# Altium PCB Octo-Electrode.PcbDoc (part 6 of 6)
Units mm, origin at the board's own origin, x right, y up, seen from the top; angles counter-clockwise.
Board outline 202.91 x 135.89 mm, 2 copper layers (Top Layer, Bottom Layer); 289 components, 165 nets, 790 pads, 510 vias.
Unrouted connection lines stored in the file: 83.
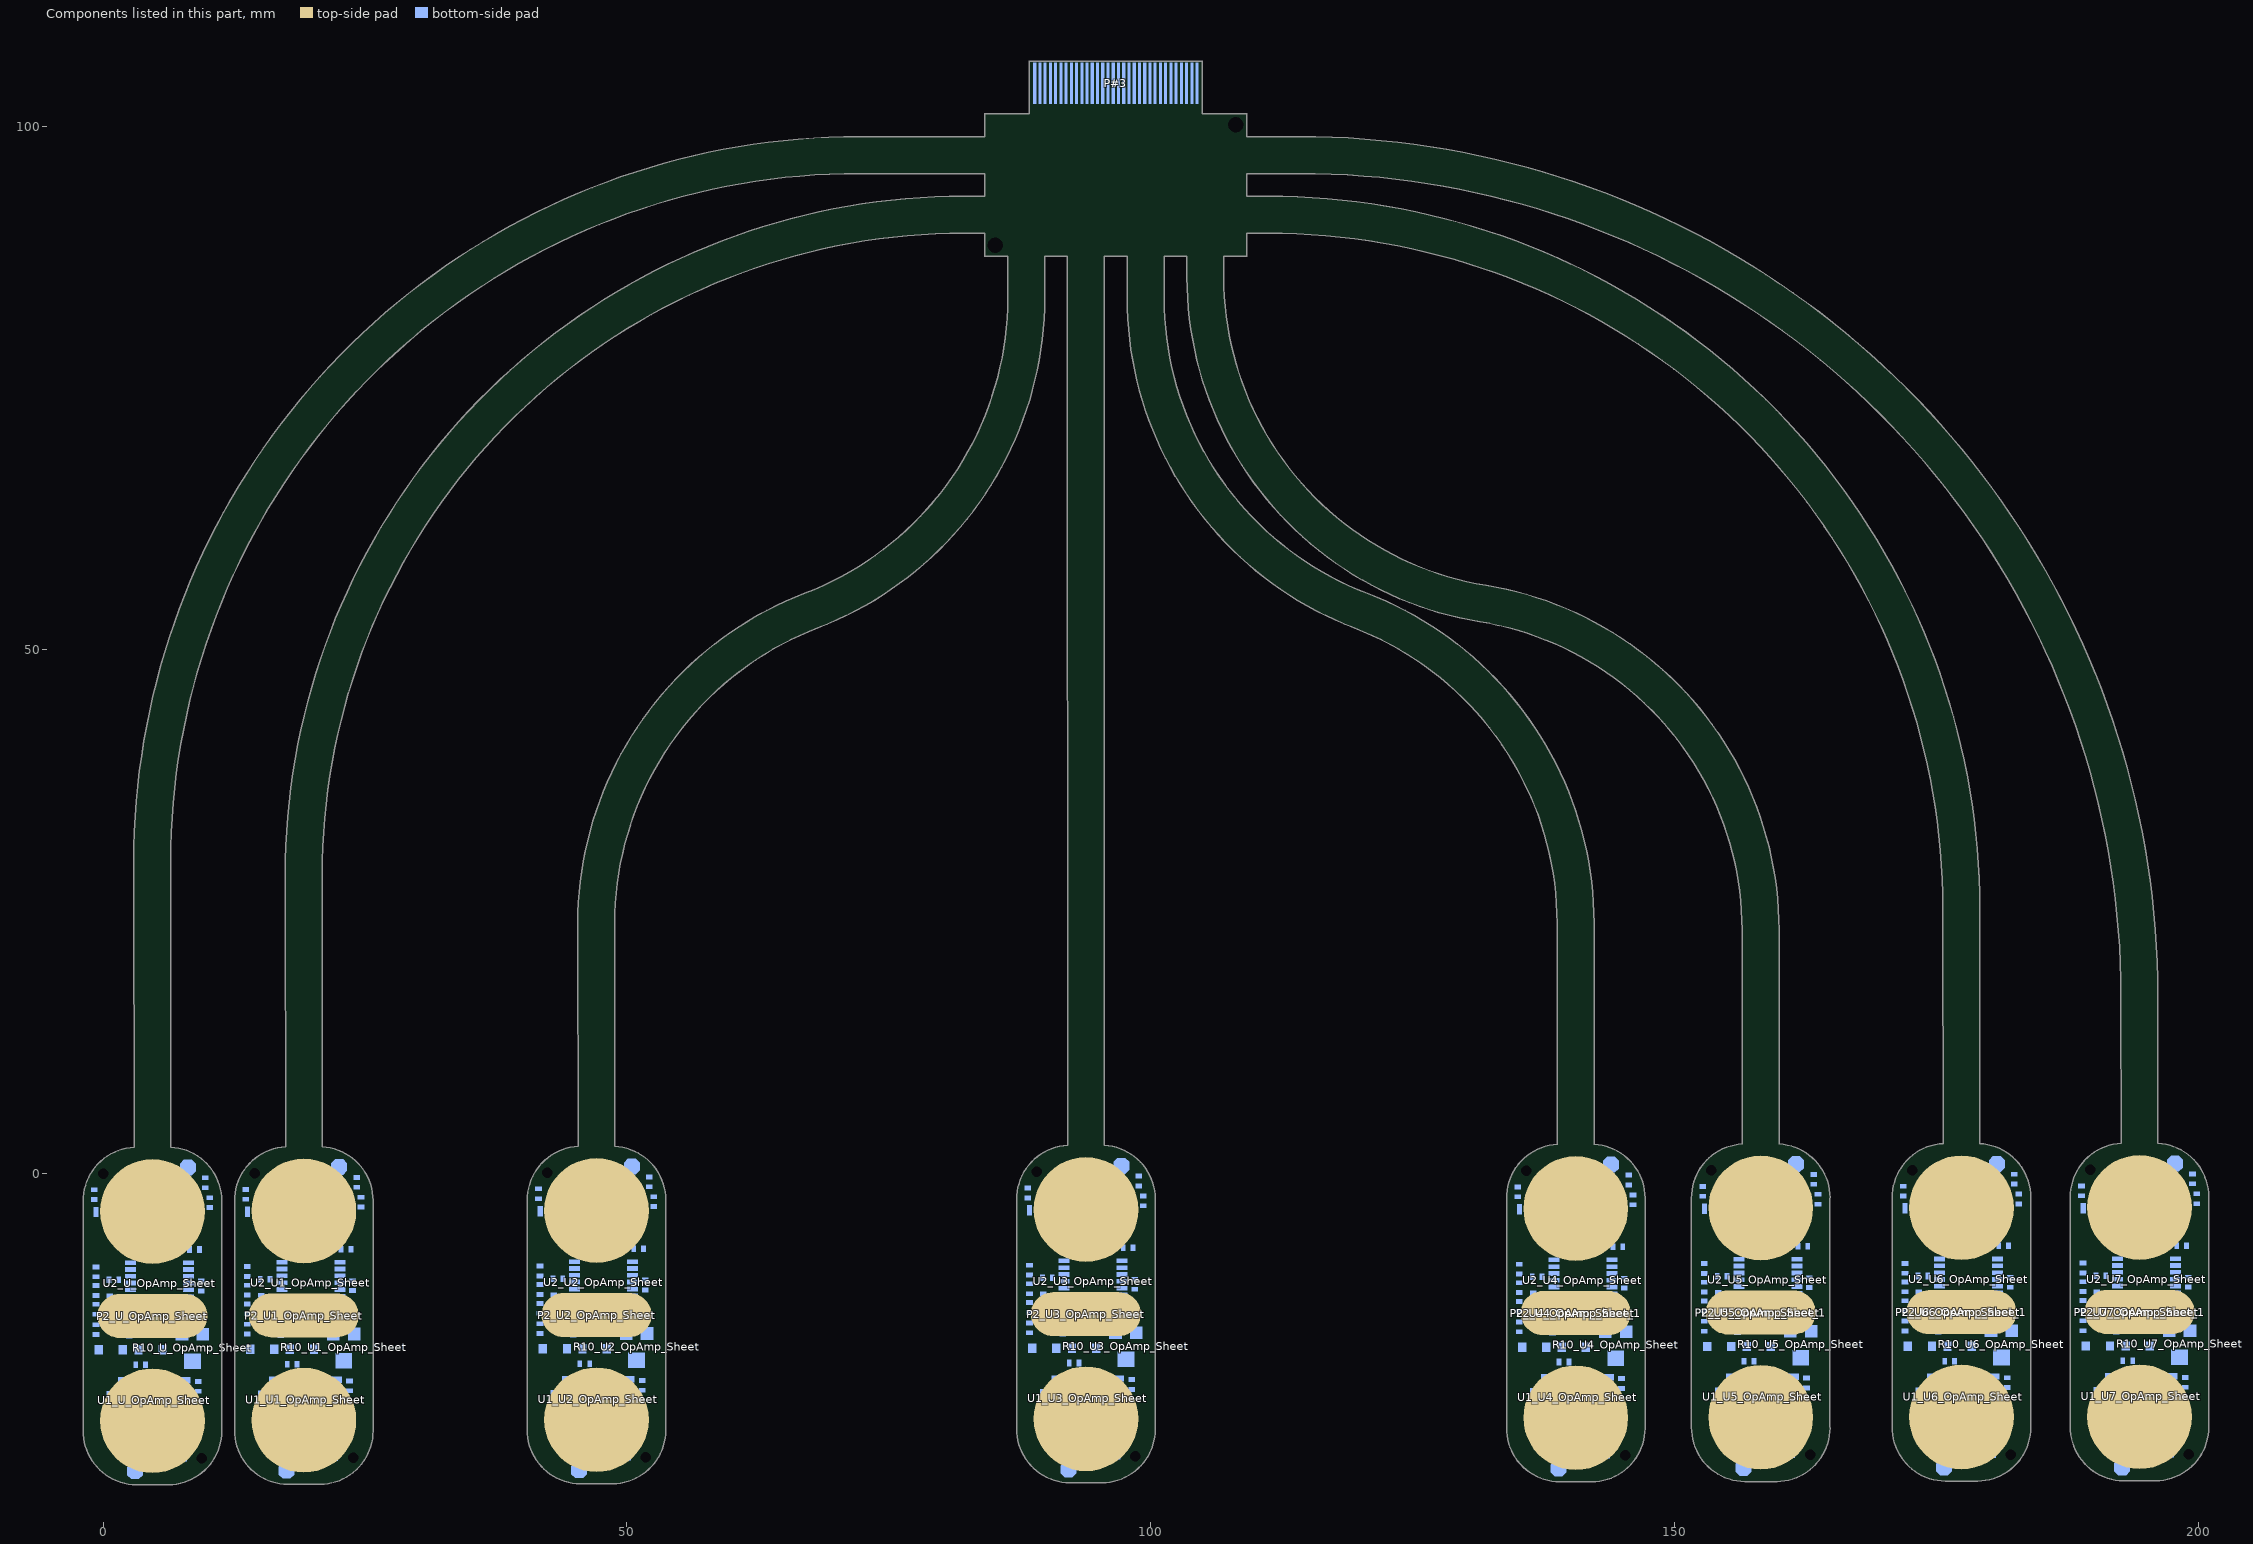
[diagram p5: the components of this part, seen from the top]

## Other copper (continued)
Bottom Layer:
  region net IN2P_U4_OpAmp_Sheet: 141.937,-16.141 139.905,-16.141 139.905,-18.326 141.937,-18.326
  region net Measure*_U4_OpAmp_Sheet: 145.188,-16.675 143.588,-16.675 143.588,-18.046 145.188,-18.046
  region net RECT_U4_OpAmp_Sheet: 135.587,-7.937 134.799,-7.937 134.799,-8.902 135.587,-8.902
  region net #rg_U4_OpAmp_Sheet: 138.888,-21.374 136.018,-21.374 136.018,-22.288 138.888,-22.288
  region net *rg_U4_OpAmp_Sheet: 138.888,-20.231 136.044,-20.231 136.044,-21.018 138.888,-21.018
  region net NetC3_U4_OpAmp_Sheet_2: 135.891,-12.916 134.697,-12.916 134.697,-14.414 135.891,-14.414
  region net IN2N_U4_OpAmp_Sheet: 135.688,-9.309 134.697,-9.309 134.697,-10.731 135.688,-10.731
  region net NetLED1_U4_OpAmp_Sheet_2: 135.484,-1.765 134.697,-1.765 134.697,-4 135.484,-4
  region net GND: 146.464,-1.638 144.477,-1.638 144.477,-2.289 146.464,-2.289
  region net NetC3_U4_OpAmp_Sheet_2: 135.891,-12.916 134.697,-12.916 134.697,-13.424 135.891,-13.424
  region net VCC_3V3: 141.886,-23.38 141.886,-24.854 143.181,-24.854 143.181,-23.38
  region net RECT_U4_OpAmp_Sheet: 139.016,-7.937 134.799,-7.937 134.799,-8.445 139.016,-8.445
  region net NetR4_U4_OpAmp_Sheet_1: 137.034,-11.925 136.272,-11.925 136.272,-15.633 137.034,-15.633
  region net NetC6_U4_OpAmp_Sheet_2: 140.844,-6.159 139.447,-6.159 139.447,-7.328 140.844,-7.328
  region net SMOOTH_U4_OpAmp_Sheet: 142.647,-6.642 141.25,-6.642 141.25,-7.353 142.647,-7.353
  region net NetR4_U4_OpAmp_Sheet_1: 137.034,-11.925 134.773,-11.925 134.773,-12.674 137.034,-12.674
  region net IN2P_U4_OpAmp_Sheet: 141.937,-17.64 139.701,-17.64 139.701,-18.326 141.937,-18.326
  region net OUT1_U4_OpAmp_Sheet: 139.625,-15.633 137.314,-15.633 137.314,-17.056 139.625,-17.056
  region net NetD1_U4_OpAmp_Sheet_2: 136.247,-15.964 135.028,-15.964 135.028,-17.259 136.247,-17.259
  region net VCC_3V3: 146.356,-22.923 141.886,-22.923 141.886,-23.787 146.356,-23.787
  region net Measure*_U4_OpAmp_Sheet: 144.07,-14.287 142.699,-14.287 142.699,-18.377 144.07,-18.377
  region net VREF_GND: 146.102,-20.129 142.622,-20.129 142.622,-21.171 146.102,-21.171
  region net -VCC_3V3: 146.966,-2.705 145.625,-2.705 145.625,-4.737 146.966,-4.737
  region net VREF_GND: 143.384,-1.911 135.714,-1.911 135.714,-2.603 143.384,-2.603
  region net VREF_GND: 142.927,-25.12 141.378,-25.12 141.378,-26.098 142.927,-26.098
  region net Measure*_U4_OpAmp_Sheet: 144.832,-11.9 143.029,-11.9 143.029,-13.449 144.832,-13.449
  region net -VCC_3V3: 145.518,-9.69 144.807,-9.69 144.807,-10.35 145.518,-10.35
  region net -VCC_3V3: 145.62,-19.088 142.14,-19.088 142.14,-19.926 145.62,-19.926
  region net NetD1_U4_OpAmp_Sheet_2: 136.907,-11.061 134.799,-11.061 134.799,-11.671 136.907,-11.671
  region net NetC1_U4_OpAmp_Sheet_2: 144.4,-24.092 143.384,-24.092 143.384,-27.419 144.4,-27.419
  region net Measure_U4_OpAmp_Sheet: 137.288,-2.883 136.425,-2.883 136.425,-6.489 137.288,-6.489
  region net RECT_U4_OpAmp_Sheet: 139.038,-6.667 138.251,-6.667 138.251,-8.41 139.038,-8.41
  region net GND: 143.405,-1.211 144.483,-2.289 145.123,-1.649 144.045,-0.571
  region net VREF_GND: 142.821,-2.583 144.172,-3.716 144.735,-3.045 143.384,-1.911
  region net VREF_GND: 145.29,-2.73 143.765,-2.73 143.765,-3.721 145.29,-3.721
  region net VREF_GND: 139.498,-14.795 137.974,-14.795 137.974,-15.456 139.498,-15.456
  region net -VCC_3V3: 142.064,-26.53 142.064,-29.019 142.969,-29.019 142.969,-26.53
  region net NetC1_U4_OpAmp_Sheet_2: 136.628,-9.639 135.841,-9.639 135.841,-10.198 136.628,-10.198
  region net IN2P_U5_OpAmp_Sheet: 159.598,-16.091 157.566,-16.091 157.566,-18.275 159.598,-18.275
  region net Measure*_U5_OpAmp_Sheet: 162.849,-16.624 161.249,-16.624 161.249,-17.996 162.849,-17.996
  region net RECT_U5_OpAmp_Sheet: 153.248,-7.886 152.46,-7.886 152.46,-8.852 153.248,-8.852
  region net #rg_U5_OpAmp_Sheet: 156.549,-21.323 153.68,-21.323 153.68,-22.237 156.549,-22.237
  region net *rg_U5_OpAmp_Sheet: 156.549,-20.18 153.705,-20.18 153.705,-20.967 156.549,-20.967
  region net NetC3_U5_OpAmp_Sheet_2: 153.552,-12.865 152.358,-12.865 152.358,-14.363 153.552,-14.363
  region net IN2N_U5_OpAmp_Sheet: 153.349,-9.258 152.358,-9.258 152.358,-10.68 153.349,-10.68
  region net NetLED1_U5_OpAmp_Sheet_2: 153.146,-1.714 152.358,-1.714 152.358,-3.949 153.146,-3.949
  region net GND: 164.125,-1.587 162.138,-1.587 162.138,-2.238 164.125,-2.238
  region net NetC3_U5_OpAmp_Sheet_2: 153.552,-12.865 152.358,-12.865 152.358,-13.373 153.552,-13.373
  region net VCC_3V3: 159.547,-23.33 159.547,-24.803 160.842,-24.803 160.842,-23.33
  region net RECT_U5_OpAmp_Sheet: 156.677,-7.886 152.46,-7.886 152.46,-8.394 156.677,-8.394
  region net NetR4_U5_OpAmp_Sheet_1: 154.695,-11.874 153.933,-11.874 153.933,-15.583 154.695,-15.583
  region net NetC6_U5_OpAmp_Sheet_2: 158.505,-6.108 157.109,-6.108 157.109,-7.277 158.505,-7.277
  region net SMOOTH_U5_OpAmp_Sheet: 160.308,-6.591 158.911,-6.591 158.911,-7.302 160.308,-7.302
  region net NetR4_U5_OpAmp_Sheet_1: 154.695,-11.874 152.434,-11.874 152.434,-12.624 154.695,-12.624
  region net IN2P_U5_OpAmp_Sheet: 159.598,-17.589 157.363,-17.589 157.363,-18.275 159.598,-18.275
  region net OUT1_U5_OpAmp_Sheet: 157.286,-15.583 154.975,-15.583 154.975,-17.005 157.286,-17.005
  region net NetD1_U5_OpAmp_Sheet_2: 153.908,-15.913 152.689,-15.913 152.689,-17.208 153.908,-17.208
  region net VCC_3V3: 164.017,-22.872 159.547,-22.872 159.547,-23.736 164.017,-23.736
  region net Measure*_U5_OpAmp_Sheet: 161.731,-14.236 160.36,-14.236 160.36,-18.326 161.731,-18.326
  region net VREF_GND: 163.763,-20.078 160.284,-20.078 160.284,-21.12 163.763,-21.12
  region net -VCC_3V3: 164.627,-2.654 163.286,-2.654 163.286,-4.686 164.627,-4.686
  region net VREF_GND: 161.046,-1.861 153.375,-1.861 153.375,-2.552 161.046,-2.552
  region net VREF_GND: 160.588,-25.07 159.039,-25.07 159.039,-26.047 160.588,-26.047
  region net Measure*_U5_OpAmp_Sheet: 162.493,-11.849 160.69,-11.849 160.69,-13.398 162.493,-13.398
  region net -VCC_3V3: 163.179,-9.639 162.468,-9.639 162.468,-10.299 163.179,-10.299
  region net -VCC_3V3: 163.281,-19.037 159.801,-19.037 159.801,-19.875 163.281,-19.875
  region net NetD1_U5_OpAmp_Sheet_2: 154.569,-11.011 152.46,-11.011 152.46,-11.62 154.569,-11.62
  region net NetC1_U5_OpAmp_Sheet_2: 162.062,-24.041 161.046,-24.041 161.046,-27.368 162.062,-27.368
  region net Measure_U5_OpAmp_Sheet: 154.95,-2.832 154.086,-2.832 154.086,-6.439 154.95,-6.439
  region net RECT_U5_OpAmp_Sheet: 156.699,-6.616 155.912,-6.616 155.912,-8.359 156.699,-8.359
  region net GND: 161.066,-1.16 162.144,-2.238 162.784,-1.598 161.706,-0.52
  region net VREF_GND: 160.482,-2.532 161.833,-3.666 162.397,-2.994 161.046,-1.861
  region net VREF_GND: 162.951,-2.679 161.427,-2.679 161.427,-3.67 162.951,-3.67
  region net VREF_GND: 157.159,-14.744 155.635,-14.744 155.635,-15.405 157.159,-15.405
  region net -VCC_3V3: 159.725,-26.479 159.725,-28.968 160.63,-28.968 160.63,-26.479
  region net NetC1_U5_OpAmp_Sheet_2: 154.289,-9.588 153.502,-9.588 153.502,-10.147 154.289,-10.147
  region net IN2P_U6_OpAmp_Sheet: 178.757,-16.065 176.725,-16.065 176.725,-18.25 178.757,-18.25
  region net Measure*_U6_OpAmp_Sheet: 182.008,-16.599 180.408,-16.599 180.408,-17.97 182.008,-17.97
  region net RECT_U6_OpAmp_Sheet: 172.407,-7.861 171.619,-7.861 171.619,-8.826 172.407,-8.826
  region net #rg_U6_OpAmp_Sheet: 175.708,-21.298 172.838,-21.298 172.838,-22.212 175.708,-22.212
  region net *rg_U6_OpAmp_Sheet: 175.708,-20.155 172.864,-20.155 172.864,-20.942 175.708,-20.942
  region net NetC3_U6_OpAmp_Sheet_2: 172.711,-12.839 171.517,-12.839 171.517,-14.338 172.711,-14.338
  region net IN2N_U6_OpAmp_Sheet: 172.508,-9.233 171.517,-9.233 171.517,-10.655 172.508,-10.655
  region net NetLED1_U6_OpAmp_Sheet_2: 172.304,-1.689 171.517,-1.689 171.517,-3.924 172.304,-3.924
  region net GND: 183.283,-1.562 181.297,-1.562 181.297,-2.213 183.283,-2.213
  region net GND: 181.424,-0.444 174.185,-0.444 174.185,-1.486 181.424,-1.486
  region net GND: 171.441,-0.927 171.441,-1.486 175.134,-1.486 175.134,-0.927
  region net NetC3_U6_OpAmp_Sheet_2: 172.711,-12.839 171.517,-12.839 171.517,-13.347 172.711,-13.347
  region net VCC_3V3: 178.706,-23.304 178.706,-24.777 180.001,-24.777 180.001,-23.304
  region net RECT_U6_OpAmp_Sheet: 175.836,-7.861 171.619,-7.861 171.619,-8.369 175.836,-8.369
  region net NetR4_U6_OpAmp_Sheet_1: 173.854,-11.849 173.092,-11.849 173.092,-15.557 173.854,-15.557
  region net SMOOTH_U6_OpAmp_Sheet: 177.664,-6.083 176.267,-6.083 176.267,-7.251 177.664,-7.251
  region net SMOOTH_U6_OpAmp_Sheet: 179.467,-6.566 178.07,-6.566 178.07,-7.277 179.467,-7.277
  region net NetR4_U6_OpAmp_Sheet_1: 173.854,-11.849 171.593,-11.849 171.593,-12.598 173.854,-12.598
  region net IN2P_U6_OpAmp_Sheet: 178.757,-17.564 176.521,-17.564 176.521,-18.25 178.757,-18.25
  region net OUT1_U6_OpAmp_Sheet: 176.445,-15.557 174.134,-15.557 174.134,-16.98 176.445,-16.98
  region net NetD1_U6_OpAmp_Sheet_2: 173.067,-15.887 171.848,-15.887 171.848,-17.183 173.067,-17.183
  region net VCC_3V3: 183.176,-22.847 178.706,-22.847 178.706,-23.711 183.176,-23.711
  region net Measure*_U6_OpAmp_Sheet: 180.89,-14.211 179.519,-14.211 179.519,-18.3 180.89,-18.3
  region net VREF_GND: 182.922,-20.053 179.442,-20.053 179.442,-21.094 182.922,-21.094
  region net -VCC_3V3: 183.786,-2.629 182.445,-2.629 182.445,-4.661 183.786,-4.661
  region net VREF_GND: 180.204,-1.835 172.534,-1.835 172.534,-2.527 180.204,-2.527
  region net VREF_GND: 179.747,-25.044 178.198,-25.044 178.198,-26.022 179.747,-26.022
  region net Measure*_U6_OpAmp_Sheet: 181.652,-11.823 179.849,-11.823 179.849,-13.373 181.652,-13.373
  region net -VCC_3V3: 182.338,-9.614 181.627,-9.614 181.627,-10.274 182.338,-10.274
  region net -VCC_3V3: 182.44,-19.012 178.96,-19.012 178.96,-19.85 182.44,-19.85
  region net NetD1_U6_OpAmp_Sheet_2: 173.727,-10.985 171.619,-10.985 171.619,-11.595 173.727,-11.595
  region net NetC1_U6_OpAmp_Sheet_2: 181.22,-24.015 180.204,-24.015 180.204,-27.343 181.22,-27.343
  region net Measure_U6_OpAmp_Sheet: 174.108,-2.806 173.245,-2.806 173.245,-6.413 174.108,-6.413
  region net RECT_U6_OpAmp_Sheet: 175.858,-6.591 175.071,-6.591 175.071,-8.334 175.858,-8.334
  region net GND: 180.225,-1.135 181.303,-2.213 181.943,-1.573 180.865,-0.495
  region net VREF_GND: 179.641,-2.507 180.992,-3.64 181.555,-2.969 180.204,-1.835
  region net VREF_GND: 182.11,-2.654 180.585,-2.654 180.585,-3.645 182.11,-3.645
  region net VREF_GND: 176.318,-14.719 174.794,-14.719 174.794,-15.379 176.318,-15.379
  region net -VCC_3V3: 178.884,-26.454 178.884,-28.943 179.788,-28.943 179.788,-26.454
  region net NetC1_U6_OpAmp_Sheet_2: 173.448,-9.563 172.661,-9.563 172.661,-10.122 173.448,-10.122
  region net IN2P_U7_OpAmp_Sheet: 195.756,-16.04 193.724,-16.04 193.724,-18.224 195.756,-18.224
  region net Measure*_U7_OpAmp_Sheet: 199.007,-16.573 197.407,-16.573 197.407,-17.945 199.007,-17.945
  region net RECT_U7_OpAmp_Sheet: 189.406,-7.836 188.618,-7.836 188.618,-8.801 189.406,-8.801
  region net #rg_U7_OpAmp_Sheet: 192.707,-21.272 189.837,-21.272 189.837,-22.187 192.707,-22.187
  region net *rg_U7_OpAmp_Sheet: 192.707,-20.129 189.863,-20.129 189.863,-20.917 192.707,-20.917
  region net NetC3_U7_OpAmp_Sheet_2: 189.71,-12.814 188.516,-12.814 188.516,-14.313 189.71,-14.313
  region net NetD1_U7_OpAmp_Sheet_2: 189.507,-9.207 188.516,-9.207 188.516,-10.63 189.507,-10.63
  region net NetLED1_U7_OpAmp_Sheet_2: 189.303,-1.663 188.516,-1.663 188.516,-3.899 189.303,-3.899
  region net GND: 200.283,-1.536 198.296,-1.536 198.296,-2.188 200.283,-2.188
  region net GND: 198.423,-0.419 191.184,-0.419 191.184,-1.46 198.423,-1.46
  region net GND: 188.44,-0.901 188.44,-1.46 192.133,-1.46 192.133,-0.901
  region net NetC3_U7_OpAmp_Sheet_2: 189.71,-12.814 188.516,-12.814 188.516,-13.322 189.71,-13.322
  region net VCC_3V3: 195.705,-23.279 195.705,-24.752 197,-24.752 197,-23.279
  region net RECT_U7_OpAmp_Sheet: 192.835,-7.836 188.618,-7.836 188.618,-8.344 192.835,-8.344
  region net NetR4_U7_OpAmp_Sheet_1: 190.853,-11.823 190.091,-11.823 190.091,-15.532 190.853,-15.532
  region net NetC6_U7_OpAmp_Sheet_2: 194.663,-6.058 193.266,-6.058 193.266,-7.226 194.663,-7.226
  region net SMOOTH_U7_OpAmp_Sheet: 196.466,-6.54 195.069,-6.54 195.069,-7.251 196.466,-7.251
  region net NetR4_U7_OpAmp_Sheet_1: 190.853,-11.823 188.592,-11.823 188.592,-12.573 190.853,-12.573
  region net IN2P_U7_OpAmp_Sheet: 195.756,-17.538 193.52,-17.538 193.52,-18.224 195.756,-18.224
  region net OUT1_U7_OpAmp_Sheet: 193.444,-15.532 191.133,-15.532 191.133,-16.954 193.444,-16.954
  region net NetD1_U7_OpAmp_Sheet_2: 190.066,-15.862 188.847,-15.862 188.847,-17.157 190.066,-17.157
  region net VCC_3V3: 200.175,-22.822 195.705,-22.822 195.705,-23.685 200.175,-23.685
  region net Measure*_U7_OpAmp_Sheet: 197.889,-14.186 196.518,-14.186 196.518,-18.275 197.889,-18.275
  region net VREF_GND: 199.921,-20.028 196.441,-20.028 196.441,-21.069 199.921,-21.069
  region net -VCC_3V3: 200.785,-2.603 199.444,-2.603 199.444,-4.635 200.785,-4.635
  region net VREF_GND: 197.203,-1.81 189.533,-1.81 189.533,-2.502 197.203,-2.502
  region net VREF_GND: 196.746,-25.019 195.197,-25.019 195.197,-25.997 196.746,-25.997
  region net Measure*_U7_OpAmp_Sheet: 198.651,-11.798 196.848,-11.798 196.848,-13.347 198.651,-13.347
  region net -VCC_3V3: 199.337,-9.588 198.626,-9.588 198.626,-10.249 199.337,-10.249
  region net -VCC_3V3: 199.439,-18.986 195.959,-18.986 195.959,-19.824 199.439,-19.824
  region net IN2N_U7_OpAmp_Sheet: 190.726,-10.96 188.618,-10.96 188.618,-11.569 190.726,-11.569
  region net NetC1_U7_OpAmp_Sheet_2: 198.219,-23.99 197.203,-23.99 197.203,-27.317 198.219,-27.317
  region net Measure_U7_OpAmp_Sheet: 191.107,-2.781 190.244,-2.781 190.244,-6.388 191.107,-6.388
  region net RECT_U7_OpAmp_Sheet: 192.857,-6.566 192.07,-6.566 192.07,-8.308 192.857,-8.308
  region net GND: 197.224,-1.11 198.302,-2.188 198.942,-1.548 197.864,-0.47
  region net VREF_GND: 196.64,-2.481 197.991,-3.615 198.554,-2.943 197.203,-1.81
  region net VREF_GND: 199.109,-2.629 197.584,-2.629 197.584,-3.619 199.109,-3.619
  region net VREF_GND: 193.317,-14.694 191.793,-14.694 191.793,-15.354 193.317,-15.354
  region net -VCC_3V3: 195.883,-26.428 195.883,-28.918 196.788,-28.918 196.788,-26.428
  region net NetC1_U7_OpAmp_Sheet_2: 190.447,-9.537 189.66,-9.537 189.66,-10.096 190.447,-10.096
  region net IN2P_U3_OpAmp_Sheet: 95.182,-16.243 93.15,-16.243 93.15,-18.427 95.182,-18.427
  region net Measure*_U3_OpAmp_Sheet: 98.433,-16.776 96.833,-16.776 96.833,-18.148 98.433,-18.148
  region net RECT_U3_OpAmp_Sheet: 88.832,-8.039 88.044,-8.039 88.044,-9.004 88.832,-9.004
  region net #rg_U3_OpAmp_Sheet: 92.133,-21.475 89.263,-21.475 89.263,-22.39 92.133,-22.39
  region net *rg_U3_OpAmp_Sheet: 92.133,-20.332 89.289,-20.332 89.289,-21.12 92.133,-21.12
  region net NetC3_U3_OpAmp_Sheet_2: 89.136,-13.017 87.942,-13.017 87.942,-14.516 89.136,-14.516
  region net IN2N_U3_OpAmp_Sheet: 88.933,-9.41 87.942,-9.41 87.942,-10.833 88.933,-10.833
  region net NetLED1_U3_OpAmp_Sheet_2: 88.729,-1.867 87.942,-1.867 87.942,-4.102 88.729,-4.102
  region net GND: 99.708,-1.74 97.722,-1.74 97.722,-2.391 99.708,-2.391
  region net GND: 97.849,-0.622 90.61,-0.622 90.61,-1.663 97.849,-1.663
  region net GND: 87.866,-1.105 87.866,-1.663 91.559,-1.663 91.559,-1.105
  region net NetC3_U3_OpAmp_Sheet_2: 89.136,-13.017 87.942,-13.017 87.942,-13.525 89.136,-13.525
  region net VCC_3V3: 95.131,-23.482 95.131,-24.955 96.426,-24.955 96.426,-23.482
  region net RECT_U3_OpAmp_Sheet: 92.261,-8.039 88.044,-8.039 88.044,-8.547 92.261,-8.547
  region net NetR4_U3_OpAmp_Sheet_1: 90.279,-12.027 89.517,-12.027 89.517,-15.735 90.279,-15.735
  region net NetC6_U3_OpAmp_Sheet_2: 94.089,-6.261 92.692,-6.261 92.692,-7.429 94.089,-7.429
  region net SMOOTH_U3_OpAmp_Sheet: 95.892,-6.743 94.495,-6.743 94.495,-7.455 95.892,-7.455
  region net NetR4_U3_OpAmp_Sheet_1: 90.279,-12.027 88.018,-12.027 88.018,-12.776 90.279,-12.776
  region net IN2P_U3_OpAmp_Sheet: 95.182,-17.742 92.946,-17.742 92.946,-18.427 95.182,-18.427
  region net OUT1_U3_OpAmp_Sheet: 92.87,-15.735 90.559,-15.735 90.559,-17.157 92.87,-17.157
  region net NetD1_U3_OpAmp_Sheet_2: 89.492,-16.065 88.273,-16.065 88.273,-17.361 89.492,-17.361
  region net VCC_3V3: 99.601,-23.025 95.131,-23.025 95.131,-23.888 99.601,-23.888
  region net Measure*_U3_OpAmp_Sheet: 97.315,-14.389 95.944,-14.389 95.944,-18.478 97.315,-18.478
  region net VREF_GND: 99.347,-20.231 95.867,-20.231 95.867,-21.272 99.347,-21.272
  region net -VCC_3V3: 100.211,-2.806 98.87,-2.806 98.87,-4.838 100.211,-4.838
  region net VREF_GND: 96.629,-2.013 88.959,-2.013 88.959,-2.705 96.629,-2.705
  region net VREF_GND: 96.172,-25.222 94.623,-25.222 94.623,-26.2 96.172,-26.2
  region net Measure*_U3_OpAmp_Sheet: 98.077,-12.001 96.274,-12.001 96.274,-13.551 98.077,-13.551
  region net -VCC_3V3: 98.763,-9.791 98.052,-9.791 98.052,-10.452 98.763,-10.452
  region net -VCC_3V3: 98.865,-19.189 95.385,-19.189 95.385,-20.028 98.865,-20.028
  region net NetD1_U3_OpAmp_Sheet_2: 90.152,-11.163 88.044,-11.163 88.044,-11.773 90.152,-11.773
  region net NetC1_U3_OpAmp_Sheet_2: 97.645,-24.193 96.629,-24.193 96.629,-27.521 97.645,-27.521
  region net Measure_U3_OpAmp_Sheet: 90.533,-2.984 89.67,-2.984 89.67,-6.591 90.533,-6.591
  region net RECT_U3_OpAmp_Sheet: 92.283,-6.769 91.496,-6.769 91.496,-8.512 92.283,-8.512
  region net GND: 96.65,-1.313 97.728,-2.391 98.368,-1.751 97.29,-0.673
  region net VREF_GND: 96.066,-2.684 97.417,-3.818 97.98,-3.147 96.629,-2.013
  region net VREF_GND: 98.535,-2.832 97.01,-2.832 97.01,-3.822 98.535,-3.822
  region net VREF_GND: 92.743,-14.897 91.219,-14.897 91.219,-15.557 92.743,-15.557
  region net -VCC_3V3: 95.309,-26.632 95.309,-29.121 96.213,-29.121 96.213,-26.632
  region net NetC1_U3_OpAmp_Sheet_2: 89.873,-9.741 89.086,-9.741 89.086,-10.299 89.873,-10.299
  region net IN2P_U2_OpAmp_Sheet: 48.46,-16.319 46.428,-16.319 46.428,-18.504 48.46,-18.504
  region net Measure*_U2_OpAmp_Sheet: 51.711,-16.853 50.111,-16.853 50.111,-18.224 51.711,-18.224
  region net RECT_U2_OpAmp_Sheet: 42.11,-8.115 41.323,-8.115 41.323,-9.08 42.11,-9.08
  region net #rg_U2_OpAmp_Sheet: 45.412,-21.552 42.542,-21.552 42.542,-22.466 45.412,-22.466
  region net *rg_U2_OpAmp_Sheet: 45.412,-20.409 42.567,-20.409 42.567,-21.196 45.412,-21.196
  region net NetC3_U2_OpAmp_Sheet_2: 42.414,-13.093 41.221,-13.093 41.221,-14.592 42.414,-14.592
  region net NetD1_U2_OpAmp_Sheet_2: 42.212,-9.487 41.221,-9.487 41.221,-10.909 42.212,-10.909
  region net NetLED1_U2_OpAmp_Sheet_2: 42.008,-1.943 41.221,-1.943 41.221,-4.178 42.008,-4.178
  region net GND: 52.987,-1.816 51,-1.816 51,-2.467 52.987,-2.467
  region net GND: 51.127,-0.698 43.888,-0.698 43.888,-1.74 51.127,-1.74
  region net GND: 41.145,-1.181 41.145,-1.74 44.838,-1.74 44.838,-1.181
  region net NetC3_U2_OpAmp_Sheet_2: 42.414,-13.093 41.221,-13.093 41.221,-13.601 42.414,-13.601
  region net VCC_3V3: 48.409,-23.558 48.409,-25.031 49.705,-25.031 49.705,-23.558
  region net RECT_U2_OpAmp_Sheet: 45.539,-8.115 41.323,-8.115 41.323,-8.623 45.539,-8.623
  region net NetR4_U2_OpAmp_Sheet_1: 43.557,-12.103 42.795,-12.103 42.795,-15.811 43.557,-15.811
  region net NetC6_U2_OpAmp_Sheet_2: 47.367,-6.337 45.971,-6.337 45.971,-7.505 47.367,-7.505
  region net SMOOTH_U2_OpAmp_Sheet: 49.171,-6.82 47.774,-6.82 47.774,-7.531 49.171,-7.531
  region net NetR4_U2_OpAmp_Sheet_1: 43.557,-12.103 41.297,-12.103 41.297,-12.852 43.557,-12.852
  region net IN2P_U2_OpAmp_Sheet: 48.46,-17.818 46.225,-17.818 46.225,-18.504 48.46,-18.504
  region net OUT1_U2_OpAmp_Sheet: 46.149,-15.811 43.837,-15.811 43.837,-17.234 46.149,-17.234
  region net NetD1_U2_OpAmp_Sheet_2: 42.771,-16.141 41.551,-16.141 41.551,-17.437 42.771,-17.437
  region net VCC_3V3: 52.88,-23.101 48.409,-23.101 48.409,-23.965 52.88,-23.965
  region net Measure*_U2_OpAmp_Sheet: 50.594,-14.465 49.222,-14.465 49.222,-18.554 50.594,-18.554
  region net VREF_GND: 52.626,-20.307 49.146,-20.307 49.146,-21.348 52.626,-21.348
  region net -VCC_3V3: 53.489,-2.883 52.149,-2.883 52.149,-4.915 53.489,-4.915
  region net VREF_GND: 49.908,-2.089 42.237,-2.089 42.237,-2.781 49.908,-2.781
  region net VREF_GND: 49.451,-25.298 47.901,-25.298 47.901,-26.276 49.451,-26.276
  region net Measure*_U2_OpAmp_Sheet: 51.356,-12.077 49.552,-12.077 49.552,-13.627 51.356,-13.627
  region net -VCC_3V3: 52.042,-9.868 51.33,-9.868 51.33,-10.528 52.042,-10.528
  region net -VCC_3V3: 52.143,-19.266 48.663,-19.266 48.663,-20.104 52.143,-20.104
  region net IN2N_U2_OpAmp_Sheet: 43.431,-11.239 41.323,-11.239 41.323,-11.849 43.431,-11.849
  region net NetC1_U2_OpAmp_Sheet_2: 50.924,-24.269 49.908,-24.269 49.908,-27.597 50.924,-27.597
  region net Measure_U2_OpAmp_Sheet: 43.812,-3.06 42.948,-3.06 42.948,-6.667 43.812,-6.667
  region net RECT_U2_OpAmp_Sheet: 45.562,-6.845 44.774,-6.845 44.774,-8.588 45.562,-8.588
  region net GND: 49.928,-1.389 51.006,-2.467 51.646,-1.827 50.568,-0.749
  region net VREF_GND: 49.345,-2.761 50.696,-3.894 51.259,-3.223 49.908,-2.089
  region net VREF_GND: 51.813,-2.908 50.289,-2.908 50.289,-3.899 51.813,-3.899
  region net VREF_GND: 46.022,-14.973 44.498,-14.973 44.498,-15.633 46.022,-15.633
  region net -VCC_3V3: 48.587,-26.708 48.587,-29.197 49.492,-29.197 49.492,-26.708
  region net NetC1_U2_OpAmp_Sheet_2: 43.152,-9.817 42.364,-9.817 42.364,-10.376 43.152,-10.376
  region net IN2P_U1_OpAmp_Sheet: 20.518,-16.384 18.486,-16.384 18.486,-18.568 20.518,-18.568
  region net #rg_U1_OpAmp_Sheet: 17.469,-21.616 14.6,-21.616 14.6,-22.531 17.469,-22.531
  region net *rg_U1_OpAmp_Sheet: 17.469,-20.473 14.625,-20.473 14.625,-21.261 17.469,-21.261
  region net IN2N_U1_OpAmp_Sheet: 14.269,-9.551 13.278,-9.551 13.278,-10.974 14.269,-10.974
  region net NetC3_U1_OpAmp_Sheet_2: 14.472,-13.158 13.278,-13.158 13.278,-13.666 14.472,-13.666
  region net VCC_3V3: 20.467,-23.623 20.467,-25.096 21.762,-25.096 21.762,-23.623
  region net NetR4_U1_OpAmp_Sheet_1: 15.615,-12.168 14.853,-12.168 14.853,-15.876 15.615,-15.876
  region net NetC6_U1_OpAmp_Sheet_2: 19.425,-6.402 18.029,-6.402 18.029,-7.57 19.425,-7.57
  region net SMOOTH_U1_OpAmp_Sheet: 21.228,-6.884 19.831,-6.884 19.831,-7.596 21.228,-7.596
  region net NetR4_U1_OpAmp_Sheet_1: 15.615,-12.168 13.354,-12.168 13.354,-12.917 15.615,-12.917
  region net IN2P_U1_OpAmp_Sheet: 20.518,-17.883 18.283,-17.883 18.283,-18.568 20.518,-18.568
  region net OUT1_U1_OpAmp_Sheet: 18.206,-15.876 15.895,-15.876 15.895,-17.298 18.206,-17.298
  region net NetD1_U1_OpAmp_Sheet_2: 14.828,-16.206 13.609,-16.206 13.609,-17.502 14.828,-17.502
  region net VCC_3V3: 24.937,-23.166 20.467,-23.166 20.467,-24.029 24.937,-24.029
  region net VREF_GND: 24.683,-20.372 21.204,-20.372 21.204,-21.413 24.683,-21.413
  region net VREF_GND: 21.508,-25.363 19.959,-25.363 19.959,-26.341 21.508,-26.341
  region net Measure#_U1_OpAmp_Sheet: 23.413,-12.142 21.61,-12.142 21.61,-13.692 23.413,-13.692
  region net -VCC_3V3: 24.099,-9.932 23.388,-9.932 23.388,-10.593 24.099,-10.593
  region net -VCC_3V3: 24.201,-19.33 20.721,-19.33 20.721,-20.169 24.201,-20.169
  region net IN2N_U1_OpAmp_Sheet: 15.489,-11.304 13.38,-11.304 13.38,-11.914 15.489,-11.914
  region net NetC1_U1_OpAmp_Sheet_2: 22.982,-24.334 21.966,-24.334 21.966,-27.662 22.982,-27.662
  region net VREF_GND: 18.079,-15.038 16.555,-15.038 16.555,-15.698 18.079,-15.698
  region net -VCC_3V3: 20.645,-26.773 20.645,-29.262 21.55,-29.262 21.55,-26.773
  region net NetC1_U1_OpAmp_Sheet_2: 15.209,-9.882 14.422,-9.882 14.422,-10.44 15.209,-10.44
  region net RECT_U1_OpAmp_Sheet: 17.619,-6.91 16.832,-6.91 16.832,-8.653 17.619,-8.653
  region net RECT_U1_OpAmp_Sheet: 17.597,-8.18 13.38,-8.18 13.38,-8.688 17.597,-8.688
  region net RECT_U1_OpAmp_Sheet: 14.168,-8.18 13.38,-8.18 13.38,-9.145 14.168,-9.145
  region net Measure#_U1_OpAmp_Sheet: 22.651,-14.529 21.28,-14.529 21.28,-18.619 22.651,-18.619
  region net Measure#_U1_OpAmp_Sheet: 23.769,-16.917 22.169,-16.917 22.169,-18.289 23.769,-18.289
  region net NetC3_U1_OpAmp_Sheet_2: 14.472,-13.158 13.278,-13.158 13.278,-14.657 14.472,-14.657
  region net -VCC_3V3: 9.754,-19.355 6.274,-19.355 6.274,-20.193 9.754,-20.193
  region net OUT1_U_OpAmp_Sheet: 3.759,-15.9 1.448,-15.9 1.448,-17.323 3.759,-17.323
  region net NetR4_U_OpAmp_Sheet_1: 1.168,-12.192 0.406,-12.192 0.406,-15.9 1.168,-15.9
  region net NetR4_U_OpAmp_Sheet_1: 1.168,-12.192 -1.093,-12.192 -1.093,-12.941 1.168,-12.941
  region net NetD1_U_OpAmp_Sheet_2: 0.381,-16.231 -0.838,-16.231 -0.838,-17.526 0.381,-17.526
  region net NetD1_U_OpAmp_Sheet_2: 1.041,-11.328 -1.067,-11.328 -1.067,-11.938 1.041,-11.938
  region net NetC6_U_OpAmp_Sheet_2: 4.978,-6.426 3.581,-6.426 3.581,-7.595 4.978,-7.595
  region net IN2P_U_OpAmp_Sheet: 6.071,-16.408 4.039,-16.408 4.039,-18.593 6.071,-18.593
  region net -VCC_3V3: 6.198,-26.797 6.198,-29.286 7.103,-29.286 7.103,-26.797
  region net NetC1_U_OpAmp_Sheet_2: 0.762,-9.906 -0.025,-9.906 -0.025,-10.465 0.762,-10.465
  region net IN2N_U_OpAmp_Sheet: -0.178,-9.576 -1.169,-9.576 -1.169,-10.998 -0.178,-10.998
  region net VREF_GND: 3.632,-15.062 2.108,-15.062 2.108,-15.723 3.632,-15.723
  region net Measure_U1_OpAmp_Sheet: 15.875,-3.111 15.011,-3.111 15.011,-6.718 15.875,-6.718
  region net NetLED1_U1_OpAmp_Sheet_2: 14.071,-1.994 13.283,-1.994 13.283,-4.229 14.071,-4.229
  region net NetC1_U_OpAmp_Sheet_2: 8.534,-24.359 7.518,-24.359 7.518,-27.686 8.534,-27.686
  region net VREF_GND: 7.061,-25.387 5.512,-25.387 5.512,-26.365 7.061,-26.365
  region net VREF_GND: 10.236,-20.396 6.756,-20.396 6.756,-21.438 10.236,-21.438
  region net Measure_U_OpAmp_Sheet: 1.422,-3.15 0.559,-3.15 0.559,-6.756 1.422,-6.756
  region net -VCC_3V3: 11.1,-2.972 9.759,-2.972 9.759,-5.004 11.1,-5.004
  region net Measure*_U_OpAmp_Sheet: 8.204,-14.554 6.833,-14.554 6.833,-18.644 8.204,-18.644
  region net Measure*_U_OpAmp_Sheet: 9.322,-16.942 7.722,-16.942 7.722,-18.313 9.322,-18.313
  region net Measure*_U_OpAmp_Sheet: 8.966,-12.167 7.163,-12.167 7.163,-13.716 8.966,-13.716
  region net RECT_U_OpAmp_Sheet: -0.279,-8.204 -1.067,-8.204 -1.067,-9.169 -0.279,-9.169
  region net RECT_U_OpAmp_Sheet: 3.172,-6.935 2.385,-6.935 2.385,-8.677 3.172,-8.677
  region net RECT_U_OpAmp_Sheet: 3.15,-8.205 -1.066,-8.205 -1.066,-8.713 3.15,-8.713
  region net NetLED1_U_OpAmp_Sheet_2: -0.382,-2.032 -1.169,-2.032 -1.169,-4.267 -0.382,-4.267
  region net VCC_3V3: 6.019,-23.647 6.019,-25.12 7.314,-25.12 7.314,-23.647
  region net VCC_3V3: 10.489,-23.189 6.019,-23.189 6.019,-24.053 10.489,-24.053
  region net SMOOTH_U_OpAmp_Sheet: 6.781,-6.909 5.384,-6.909 5.384,-7.62 6.781,-7.62
  region net #rg_U_OpAmp_Sheet: 3.022,-21.641 0.152,-21.641 0.152,-22.555 3.022,-22.555
  region net *rg_U_OpAmp_Sheet: 3.022,-20.498 0.178,-20.498 0.178,-21.285 3.022,-21.285
  region: 152.283,-0.952 152.283,-1.511 155.976,-1.511 155.976,-0.952
  region: 162.265,-0.47 155.026,-0.47 155.026,-1.511 162.265,-1.511
  region: 134.621,-1.003 134.621,-1.562 138.314,-1.562 138.314,-1.003
  region: 144.604,-0.52 137.365,-0.52 137.365,-1.562 144.604,-1.562
  region: 23.876,-2.959 22.352,-2.959 22.352,-3.949 23.876,-3.949
  region: 25.552,-2.933 24.212,-2.933 24.212,-4.965 25.552,-4.965
  region: 25.05,-1.867 23.063,-1.867 23.063,-2.518 25.05,-2.518
  region: 0.025,-13.183 -1.169,-13.183 -1.169,-14.681 0.025,-14.681
  region: 10.598,-1.905 8.611,-1.905 8.611,-2.556 10.598,-2.556
  region: 0.025,-13.183 -1.169,-13.183 -1.169,-13.691 0.025,-13.691
  region: 6.071,-17.907 3.835,-17.907 3.835,-18.593 6.071,-18.593
  region net -VCC_3V3: 9.652,-9.957 8.941,-9.957 8.941,-10.617 9.652,-10.617
  region: 9.424,-2.997 7.899,-2.997 7.899,-3.988 9.424,-3.988

## Silkscreen, mask and mechanical layers (free items; w line width, h text height)
Mechanical 2:
  drawing of 235 lines, arcs and shapes, not listed